# Altium PCB PCB2.PcbDoc (part 2 of 2)
Units mil, origin at the board's own origin, x right, y up, seen from the top; angles counter-clockwise.
Board outline 3543.02 x 3779.37 mil, 2 copper layers (Top Layer, Bottom Layer), stack 62.206 mil thick; 106 components, 60 nets, 312 pads, 222 vias.
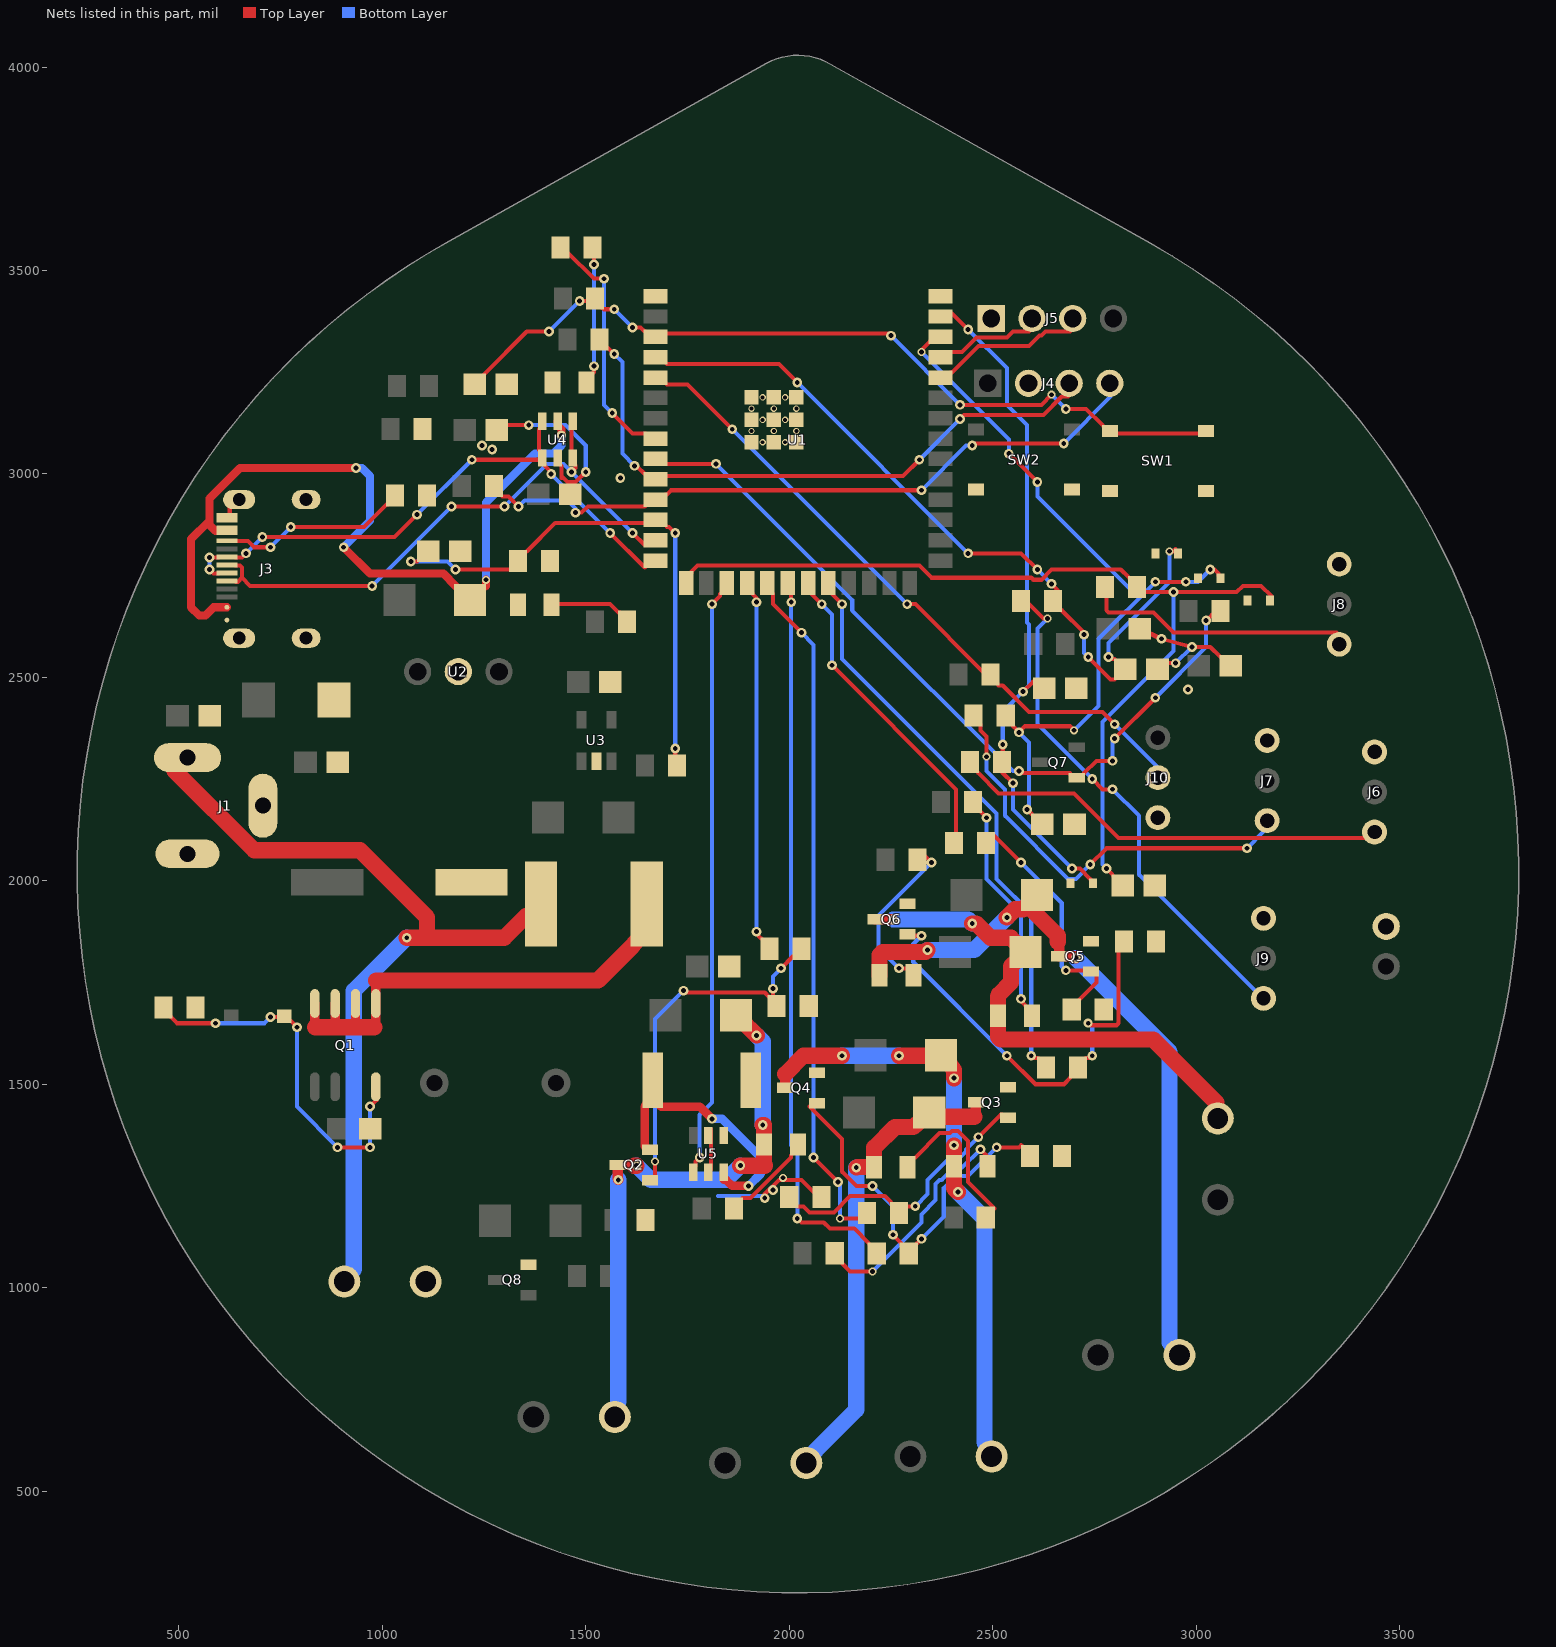
[diagram p2: the nets of this part, all layers, seen from the top]

## Via types
v1: diameter 24.02, hole 12.01, Top Layer to Bottom Layer, tented both sides, 192 vias
v2: diameter 19.68, hole 11.81, Top Layer to Bottom Layer, tented both sides, 15 vias
v3: diameter 15.75, hole 9.8, Top Layer to Bottom Layer, tented both sides, 12 vias
v4: diameter 22, hole 12, Top Layer to Bottom Layer, tented both sides, 3 vias

## Nets (pads, with @x,y where several pads share a name; then routed paths per layer and width w, separated by ;. In a path a pad name is that pad's centre, name@x,y a point inside that pad or via, vN(x,y) a via of type N, cw(c..) or ccw(c..) an arc to the next point about the centre after c; other vN are vias at no path point) (continued)
CC2: J3.B5 R8.1 | length 473.6
  Top Layer w10: J3.B5@617.9,2835.7 638.49,2835 640,2835 670,2835 685,2820 v1(725,2820) ; v1(775,2870) 955,2870 1010,2925 1013.66,2925.48 R8.1@1030.96,2947.59
  Bottom Layer w10: v1(725,2820) v1(775,2870)
DHT_DATA: J10.2 R19.2 U1.5 | length 1655
  Top Layer w10: U1.5@1671.13,3237.05 1695.65,3224.33 1700,3220 1750,3220 v1(1860,3110) ; v1(2290,2680) 2310,2680 2475,2515 2477.27,2515 R19.2@2494.56,2506.7 2511.86,2484.59 2515,2480 2525,2480 2590,2415 2770,2415 v1(2800,2385)
  Bottom Layer w10: v1(1860,3110) v1(2290,2680) ; v1(2800,2385) 2905,2280 2905.04,2279.21 J10.2@2906.33,2253.73
EN: C9.1 R5.2 SW1.1 SW1.2 U1.3 | length 2044.7
  Top Layer w10: C9.1@1226.71,3220.66 1249.46,3242.23 1250,3245 1355,3350 v1(1410,3350) ; v1(1485,3425) 1505,3425 1505.56,3425 R5.2@1522.85,3431.03 1540.15,3408.92 1545,3405 v1(1570,3405) ; v1(1615,3360) 1635,3360 1645,3350 1646.6,3349.76 U1.3@1671.13,3337.05 1695.65,3345 1700,3345 2245,3345 v1(2250,3340) ; v1(2420,3170) 2620,3170 v2(2645,3195) ; v1(2680,3160) 2730,3160 2770,3120 2773.47,3115.53 SW1.1@2788.16,3105.77 2802.84,3100 2805,3100 3005,3100 3009.69,3100 SW1.2@3024.38,3105.77
  Bottom Layer w10: v1(1410,3350) v1(1485,3425) ; v1(1570,3405) v1(1615,3360) ; v1(2250,3340) v1(2420,3170) ; v2(2645,3195) v1(2680,3160)
G_PUMP: Q2.1 R21.2 R22.1 | length 921.3
  Top Layer w10: Q2.1@1657.39,1264.16 1670,1271.96 1670,1275 v2(1670,1310) ; v1(1740,1730) 1745,1725 1940,1725 1950,1715 1952,1714.61 R22.1@1969.29,1692.5 1960,1714.61 1960,1715 v1(1960,1735) ; v1(1980,1785) 2010,1815 2012.99,1815 R21.2@2030.28,1833.09
  Bottom Layer w10: v2(1670,1310) 1670,1660 v1(1740,1730) ; v1(1960,1735) 1960,1765 v1(1980,1785)
G_V1: Q3.1 R24.2 R25.1 | length 715.7
  Top Layer w10: R25.1@2000.32,1223.27 2017.61,1201.17 2020,1200 2035,1200 2050,1185 2110,1185 2150,1225 2235,1225 2250,1210 2252.32,1205.59 R24.2@2269.61,1183.48 2286.91,1200 2290,1200 v1(2310,1200) ; v1(2465,1370) 2520,1425 2523.06,1425 Q3.1@2537.74,1418.14
  Bottom Layer w10: v1(2310,1200) 2340,1230 2340,1265 2390,1315 2415,1315 2435,1335 2435,1340 v1(2465,1370)
G_V2: Q4.1 R27.2 R28.1 | length 967.5
  Top Layer w10: Q4.1@2068.62,1453.52 2053.93,1445.72 2050,1445 2130,1365 2130,1285 2165,1250 v1(2205,1250) ; v1(2255,1130) 2275,1110 2276.74,1105.93 R27.2@2294.03,1083.82 2311.33,1105.93 2315,1110 v1(2325,1120) ; v1(2510,1345) 2565,1345 2570,1350 2574.33,1346.24 R28.1@2591.62,1324.13
  Bottom Layer w10: v1(2205,1250) 2255,1200 v1(2255,1130) ; v1(2325,1120) 2380,1175 2380,1245 2410,1275 2440,1275 v1(2510,1345)
G_V3: Q5.1 R30.2 R31.1 | length 617
  Top Layer w10: R30.2@2484.11,2092.95 2501.4,2110 2505,2110 v1(2570,2045) ; v1(2680,1780) 2725,1780 2727.64,1780 Q5.1@2742.33,1777.08 2755,1769.28 2755,1765 2755,1750 2715,1710 2711.94,1705.8 R31.1@2694.64,1683.69
  Bottom Layer w10: v1(2570,2045) 2670,1945 2670,1790 v1(2680,1780)
G_V4: Q6.1 R33.2 R34.1 | length 1072.7
  Top Layer w10: Q6.1@2290.65,1868.49 2305.34,1865 2310,1865 v1(2325,1865) ; v1(2535,1570) 2605,1500 2675,1500 2690,1515 2692.47,1519.57 R33.2@2709.77,1541.68 2727.06,1563.78 2730,1565 2740,1565 v1(2745,1570) ; v4(2735,1650) 2740,1645 2805,1645 2810,1650 2810,1825 2810,1828.68 R34.1@2822.98,1850.79
  Bottom Layer w10: v1(2325,1865) 2305,1845 2305,1800 v1(2535,1570) ; v4(2735,1650) 2745,1640 v1(2745,1570)
GND: C1.2 C2.2 C3.2 C4.2 C5.2 C6.2 C7.2 C8.2 C9.2 C10.2 C11.2 C12.2 C13.2 C14.2 C15.2 C16.2 D1.2 D6.1 D7.1 D8.1 D9.1 J1.2 J1.3 J2.2 J3.1 J3.2 J3.3 J3.4 J3.A1B12 J3.B1A12 J4.2 J5.1 J6.1 J7.1 J8.1 J9.1 J10.3 J11.2 LED1.2 LED2.2 Q3.2 Q4.2 Q5.2 Q6.2 Q8.2 R1.2 R4.2 R7.2 R8.2 R11.2 R22.2 R25.2 R28.2 R31.2 R34.2 RS1.2 SW1.3 SW1.4 SW2.3 SW2.4 U1.1 U1.40 U1.41 U2.2 U3.2 U4.2 U5.2 U5.4 U5.5 | length 1290
  Top Layer w10: C8.2@1280.94,3108.09 1303.69,3120 1305,3120 v1(1360,3120) ; U4.2@1430.96,3039.26 1436.43,3023.16 1440,3020 1440,2995 1455,2980 1475,2980 v1(1500,3005) ; 1440,2990 1440,3015 ; U5.2@1808,1290 U5.5@1808,1390 ; v1(1940,1220) 1940,1230 1975,1265 ; v1(1960,1240) 1960,1250 1975,1265 ; v2@1980,1265 1975,1265 ; R25.2@2079.06,1223.27 2061.76,1235 2060,1235 2030,1265 1975,1265 ; C14.2@2905.29,2519.62 2928.05,2535 2930,2535 v1(2950,2535) ; v1(2915,2595) v1(2990,2575) 3035,2575 3060,2550 3063.04,2549.88 C15.2@3085.79,2528.3
  Top Layer w12: J3.B1A12@625,2893 J3.1@625,2937 ; C10.2@2861.86,2619.99 v1(2915,2595)
  Bottom Layer w10: v1(1360,3120) 1450,3120 1500,3070 v1(1500,3005) ; 1825,1225 1935,1225 v1(1940,1220) ; v1(2950,2535) v1(2990,2575)
  other v1: 2980,2470 1585,2990 1270,3060 1245,3070
  other v2: 1985,1270
  other v3: 1934.91,3078.01 1990.03,3078.01 1907.35,3105.57 1962.47,3105.57 2017.59,3105.57 1934.91,3133.13 1990.03,3133.13 1907.35,3160.69 1962.47,3160.69 2017.59,3160.69 1934.91,3188.25 1990.03,3188.25
LED2_A: LED2.1 R9.2 | length 338.7
  Top Layer w10: LED2.1@1501.28,3224.85 1515.96,3247.4 1520,3250 v1(1520,3265) ; R9.2@1516.43,3556.74 1520,3534.64 1520,3530 v1(1520,3515)
  Bottom Layer w10: v1(1520,3265) v1(1520,3515)
LED_PUMP: LED3.1 R23.2 | length 231.3
  Top Layer w10: R23.2@1863.96,1194.12 1881.26,1216.22 1885,1220 1905,1220 2005,1320 2005,1325 2006.55,1329.33 LED3.1@2021.24,1351.88
LED_V1: LED4.1 R26.2 | length 423.4
  Top Layer w10: LED4.1@2290.73,1296.26 2305.41,1318.81 2310,1320 2370,1380 2395,1380 2400,1385 2415,1385 2440,1360 2440,1260 2505,1195 2500.54,1194.46 R26.2@2483.25,1172.36
LED_V2: LED5.1 R29.2 | length 586.8
  Top Layer w10: R29.2@2111.89,1084.66 2129.18,1062.56 2130,1060 2150,1040 v2(2205,1040) ; v1(2470,1340) 2485,1325 2485,1320.57 LED5.1@2487.27,1298.02
  Bottom Layer w10: v2(2205,1040) 2325,1160 2325,1180 2360,1215 2360,1255 2370,1265 2375,1265 2405,1295 2425,1295 v1(2470,1340)
LED_V3: LED6.1 R32.2 | length 420.9
  Top Layer w10: v1(2270,1785) 2290,1785 2290.56,1785 LED6.1@2305.25,1767.54 ; R32.2@2315.09,2051.76 2332.38,2060 2335,2060 v1(2350,2045)
  Bottom Layer w10: v1(2270,1785) 2220,1835 2220,1915 v1(2350,2045)
LED_V4: LED7.1 R35.2 | length 581.8
  Top Layer w10: R35.2@2452.08,2193.44 2469.38,2171.34 2470,2170 v1(2485,2155) ; v1(2570,1710) 2570,1705 2580,1695 2581.7,1690.5 LED7.1@2596.39,1667.95
  Bottom Layer w10: v1(2485,2155) 2485,2005 2565,1925 2565,1920 2570,1915 v1(2570,1710)
LED_WIFI: R9.1 U1.8 | length 606.1
  Top Layer w10: R9.1@1437.69,3556.74 1454.99,3545 1520,3480 v1(1545,3480) ; v1(1565,3150) 1615,3100 1645,3100 1646.6,3099.76 U1.8@1671.13,3087.05
  Bottom Layer w10: v1(1545,3480) 1545,3170 v1(1565,3150)
MOIST1: C11.1 D6.2 R15.2 U1.39 | length 1706.5
  Top Layer w10: U1.39@2371.9,3387.05 2396.42,3395 2400,3395 v1(2440,3355) ; v1(2525,2335) 2525,2315 2525,2313.84 R15.2@2523.15,2291.73 2525,2269.63 2525,2265 v1(2550,2240) ; v1(2575,2465) 2600,2490 2604.52,2490 C11.1@2627.28,2473.12 ; v1(2695,2030) 2715,2030 2740,2005 2741.52,2001.23 D6.2@2746.37,1994.42
  Bottom Layer w10: v1(2440,3355) 2535,3260 2535,3170 2585,3120 2585,2635 2590,2630 2590,2480 v1(2575,2465) 2525,2415 v1(2525,2335) ; v1(2550,2240) 2550,2175 v1(2695,2030)
MOIST2: C12.1 D7.2 R16.2 U1.38 | length 1975.5
  Top Layer w10: v2(2325,3300) 2325,3305 2345,3325 2347.37,3325 U1.38@2371.9,3337.05 ; R16.2@2532.23,2406.32 2549.53,2384.21 2550,2380 v1(2565,2365) 2580,2380 2690,2380 v2(2700,2370) ; v1(2540,3050) v1(2610,2980) ; v1(2585,2175) 2595,2165 2599.74,2160.66 C12.1@2622.49,2139.08 ; v1(2900,2735) v1(2975,2735) ; v1(3035,2765) 3045,2765 3055,2755 3055.33,2750.1 D7.2@3060.18,2743.29
  Bottom Layer w10: v2(2325,3300) 2540,3085 v1(2540,3050) ; v1(2565,2365) 2590,2340 2590,2180 v1(2585,2175) ; v1(2610,2980) 2610,2945 2860,2695 ; v2(2700,2370) 2760,2430 2760,2595 v1(2900,2735) ; v1(2975,2735) 3005,2735 v1(3035,2765)
MOIST3: C13.1 D8.2 R17.2 U1.15 | length 2353.2
  Top Layer w10: U1.15@1746.52,2731.96 1759.23,2756.49 1760,2760 1775,2775 2320,2775 2350,2745 2595,2745 2600,2740 2620,2740 2645,2765 2815,2765 2835,2745 2837.47,2744.84 R17.2@2854.76,2722.74 2872.06,2710 2875,2710 3100,2710 3115,2725 3160,2725 3185,2700 3185,2695.9 D8.2@3181.85,2689.09 ; v1(2780,2030) 2795,2015 2796.77,2010.01 C13.1@2819.52,1988.44
  Bottom Layer w10: v1(2780,2030) 2770,2040 2770,2390 2945,2565 v1(2945,2710)
MOIST4: C14.1 D9.2 R18.2 U1.4 | length 1957.1
  Top Layer w10: U1.4@1671.13,3287.05 1695.65,3274.33 1700,3270 1975,3270 v1(2020,3225) ; v1(2440,2805) 2570,2805 v1(2610,2765) ; v1(2645,2730) 2660,2715 2660,2710.15 R18.2@2648.22,2688.04 2665.52,2665.94 2670,2665 2725,2610 v1(2725,2605) ; v1(2735,2550) 2790,2495 2800,2495 2803.8,2498.05 C14.1@2826.55,2519.62 2803.8,2541.2 2800,2545 2790,2545 v1(2785,2550) ; v2(2935,2810) 2945,2810 2950,2815 2950.86,2811.45 D9.2@2955.71,2804.64
  Bottom Layer w10: v1(2020,3225) v1(2440,2805) ; v1(2610,2765) v1(2645,2730) ; v1(2725,2605) 2725,2560 v1(2735,2550) ; v1(2785,2550) 2785,2585 2935,2735 v2(2935,2810)
MSIG1: J6.3 R15.1 | length 1078.1
  Top Layer w10: R15.1@2444.41,2291.73 2461.71,2269.63 2465,2265 2515,2215 2700,2215 2810,2105 3415,2105 3417.22,2106.39 J6.3@3438.83,2119.93
MSIG2: J7.3 R16.1 | length 1053.2
  Top Layer w10: R16.1@2453.49,2406.32 2470,2384.21 2470,2380 2470,2370 2485,2355 v2(2485,2305) ; v1(2740,2040) 2780,2080 v1(3125,2080)
  Bottom Layer w10: v2(2485,2305) 2485,2270 2530,2225 2530,2160 2685,2005 2705,2005 v1(2740,2040) ; v1(3125,2080) 3165,2120 3166.39,2123.99 J7.3@3174.76,2148.08
MSIG3: J8.3 R17.1 | length 675.3
  Top Layer w10: R17.1@2776.02,2722.74 2780,2700.63 2780,2700 2780,2665 2785,2660 2895,2660 2945,2610 3345,2610 3345.94,2606.18 J8.3@3352.06,2581.4
MSIG4: J9.3 R18.1 | length 1271.7
  Top Layer w10: R18.1@2569.48,2688.04 2586.78,2680 2590,2680 2625,2645 v2(2635,2645) ; v1(2745,2250) 2770,2225 v1(2795,2225)
  Bottom Layer w10: v2(2635,2645) 2610,2620 2610,2385 v1(2745,2250) ; v1(2795,2225) 2860,2160 2860,2015 3145,1730 3147.05,1728.13 J9.3@3165.88,1710.91
OUT_PUMP: D10.2 J12.2 LED3.2 Q2.3 | length 1412.2
  Top Layer w25.59: v1(1580,1265) 1578.65,1268.27 Q2.3@1578.65,1301.56 1618.83,1301.56 v1@1620,1300
  Top Layer w39.37: v1(1935,1400) 1938.54,1399.93 LED3.2@1938.54,1351.88 1938.54,1303.83 1940,1300
  Top Layer w40: v1@1620,1300 v1(1625,1300) ; D10.2@1869.78,1669.61 1889.15,1650.24 1905,1635 v1(1920,1620) ; v1(1880,1300) 1940,1300
  Bottom Layer w40: J12.2@1571.36,682.24 1575.68,701.13 1580,720 v1(1580,1265) ; v1(1625,1300) 1660,1265 1845,1265 v1(1880,1300) ; v1(1920,1620) 1935,1605 v1(1935,1400)
OUT_V1: D11.2 J13.2 LED4.2 Q3.3 | length 1188.7
  Top Layer w25.59: 2455,1420 2459,1422.24 Q3.3@2459,1455.54
  Top Layer w39.37: v1(2165,1295) 2167.84,1296.26 LED4.2@2208.03,1296.26 2208.03,1344.31 2210,1345
  Top Layer w40: 2210,1345 2260,1395 2305,1395 2324.97,1411.59 D11.2@2344.34,1430.96 2363.71,1420 2380,1420 2455,1420
  Bottom Layer w40: J13.2@2042.19,569.15 2053.71,584.72 2065,600 2165,700 v1(2165,1295)
OUT_V2: D12.2 J14.2 LED5.2 Q4.3 | length 1469.7
  Top Layer w25.59: Q4.3@1989.88,1490.92 1989.88,1524.21 1990,1525
  Top Layer w39.37: 2405,1245 2404.57,1249.97 LED5.2@2404.57,1298.02 2404.57,1346.07 v1(2405,1350)
  Top Layer w40: 1990,1525 2035,1570 v1(2130,1570) ; v1(2270,1570) 2335,1570 2353.94,1570 D12.2@2373.31,1571.31 2392.68,1551.94 2405,1535 v1(2405,1515) ; 2405,1245 v1(2415,1235)
  Bottom Layer w40: v1(2130,1570) v1(2270,1570) ; v1(2405,1350) v1(2405,1515) ; v1(2415,1235) 2480,1170 2480,620 2488.93,602.34 J14.2@2497.67,585.05
OUT_V3: D13.2 J15.2 LED6.2 Q5.3 | length 1806.8
  Top Layer w25.59: 2660,1850 2663.59,1847.78 Q5.3@2663.59,1814.48 2703.77,1814.48 v1(2705,1810)
  Top Layer w39.37: LED6.2@2222.55,1767.54 2222.55,1818.09 2225,1820
  Top Layer w40: 2225,1820 2230,1825 2335,1825 v1(2340,1830) ; v1(2535,1910) 2555,1930 2575,1930 2590.16,1945.64 D13.2@2609.53,1965.01 2595,1945.64 2595,1930 2660,1865 2660,1850
  Bottom Layer w40: v1(2340,1830) 2455,1830 v1(2535,1910) ; v1(2705,1810) 2935,1580 2935,865 2947.14,849.53 J15.2@2959.1,834.3
OUT_V4: D14.2 J16.2 LED7.2 Q6.3 | length 1280
  Top Layer w25.59: Q6.3@2211.91,1905.89 2252.1,1905.89 v1(2255,1905)
  Top Layer w39.37: 2515,1615 2513.69,1617.4 LED7.2@2513.69,1667.95 2513.69,1716 2515,1720
  Top Layer w40: v1(2450,1895) 2460,1895 2495,1860 2545,1860 2561.19,1844.03 D14.2@2580.56,1824.66 2561.19,1805.29 2545,1790 2545,1750 2515,1720 ; 2515,1615 2520,1610 2895,1610 3050,1455 3051.8,1435.4 J16.2@3053.58,1416.11
  Bottom Layer w40: v1(2255,1905) 2440,1905 v1(2450,1895)
PUMP_EN: R21.1 U1.18 | length 917.9
  Top Layer w10: U1.18@1896.52,2731.96 1909.23,2707.43 1910,2705 1920,2695 v1(1920,2685) ; v1(1920,1875) 1920,1870 1930,1860 1934.25,1855.2 R21.1@1951.54,1833.09
  Bottom Layer w10: v1(1920,1875) v1(1920,2685)
PUMP_ISENSE: U1.17 U5.1 | length 1479.6
  Top Layer w10: U5.1@1763.93,1283.68 1769.4,1299.78 1770,1300 1770,1310 v1(1780,1320) ; v1(1810,2680) 1830,2700 1830,2705 1833.8,2707.43 U1.17@1846.52,2731.96
  Bottom Layer w10: v1(1780,1320) 1780,1425 1810,1455 v1(1810,2680)
PUMP_SRC: Q2.2 RS1.1 U5.3 | length 715.7
  Top Layer w20.95: Q2.2@1657.39,1338.96 1648.17,1341.29 1645,1350 1645,1445 1649.8,1452.14 RS1.1@1664.57,1509.7 1679.34,1452.14 1685,1445 1780,1445 v1(1810,1415) ; U5.3@1838.73,1283.68 1838.73,1265 1845,1265 1860,1250 v1(1900,1250)
  Bottom Layer w20.95: v1(1810,1415) 1835,1415 1930,1320 1930,1280 v1(1900,1250)
PWR_LED_A: LED1.1 R2.2 | length 204.4
  Top Layer w10: LED1.1@1416.25,2678.51 1430.94,2680 1435,2680 1560,2680 1580,2660 1584.14,2658.96 R2.2@1601.43,2636.85
Q1_G: D2.2 Q1.4 R1.1 | length 934.6
  Top Layer w10: R1.1@462.41,1689.04 479.7,1666.93 480,1665 495,1650 v1(590,1650) ; v1(725,1665) 745,1665 745.61,1665 D2.2@758.52,1666.64 771.43,1655.1 775,1655 v1(790,1640) ; v1(890,1345) v1(970,1345) ; v1(970,1445) 985,1460 984.67,1463.4 Q1.4@984.03,1493.8
  Bottom Layer w10: v1(590,1650) 710,1650 v1(725,1665) ; v1(790,1640) 790,1445 v1(890,1345) ; v1(970,1345) v1(970,1445)
RXD0: J5.3 U1.36 | length 395.6
  Top Layer w10: U1.36@2371.9,3237.05 2396.42,3249.76 2400,3250 2465,3315 2590,3315 2615,3340 2620,3340 2630,3350 2690,3350 2690.95,3354.43 J5.3@2696.92,3382.26
SCL: J4.4 R13.2 U1.11 | length 1710.7
  Top Layer w10: R13.2@1274.06,2970.41 1291.35,2948.31 1295,2945 1310,2945 v1(1335,2920) ; v1(1475,2905) 1490,2905 1505,2920 1645,2920 1646.6,2924.33 U1.11@1671.13,2937.05 1695.65,2949.76 1700,2950 1710,2960 v1(2325,2960) ; v1(2450,3070) 2455,3075 v1(2675,3075)
  Bottom Layer w10: v1(1335,2920) 1350,2935 1455,2935 1475,2915 v1(1475,2905) ; v1(2325,2960) 2435,3070 v1(2450,3070) ; v1(2675,3075) 2790,3190 2789.75,3194.51 J4.4@2788.17,3222.93
SDA: J4.3 R12.2 U1.10 | length 1539
  Top Layer w10: R12.2@1533.62,3330.1 1550.91,3310 1555,3310 v1(1570,3295) ; v1(1620,3020) 1625,3020 1645,3000 1646.6,2999.76 U1.10@1671.13,2987.05 1695.65,2995 1700,2995 2280,2995 v1(2320,3035) ; v1(2420,3135) 2430,3145 2625,3145 2670,3190 2685,3190 2685.44,3194.6 J4.3@2688.17,3222.93
  Bottom Layer w10: v1(1570,3295) 1590,3275 1590,3050 v1(1620,3020) ; v1(2320,3035) v1(2420,3135)
SENS_PWR_N: Q7.1 R14.2 U1.9 | length 1960.4
  Top Layer w10: U1.9@1671.13,3037.05 1695.65,3025 1700,3025 v1(1820,3025) ; v1(2565,2270) 2570,2265 2690,2265 2692.16,2260.51 Q7.1@2706.84,2253.69 2721.53,2260.51 2725,2265 2755,2295 v1(2795,2295) ; v1(2800,2350) v1(2900,2450) ; v1(3025,2640) 3040,2655 3043.2,2655 R14.2@3060.5,2663.28
  Bottom Layer w10: v1(1820,3025) 2155,2690 2155,2665 2550,2270 v1(2565,2270) ; v1(2795,2295) 2795,2345 v1(2800,2350) ; v1(2900,2450) 3025,2575 v1(3025,2640)
TXD0: J5.2 U1.37 | length 274.9
  Top Layer w10: U1.37@2371.9,3287.05 2396.42,3299.76 2400,3300 2425,3300 2460,3335 2535,3335 2550,3350 2590,3350 2590.95,3354.43 J5.2@2596.92,3382.26
USB_DN: J3.A7 J3.B7 U1.13 U4.3 U4.4 | length 1471.2
  Top Layer w10: J3.B7@617.9,2737.27 638.49,2736.36 640,2735 645,2735 655,2745 ; J3.A7@617.9,2776.64 638.49,2775.73 640,2775 650,2775 655,2770 655,2745 ; v1(975,2725) 675,2725 655,2745 ; v1(1170,2920) v1(1300,2920) ; v1(1465,3005) 1475,3015 1475,3020 1473.83,3023.16 U4.3@1468.36,3039.26 1465,3055.36 1465,3060 1465,3110 1465,3113.64 U4.4@1468.36,3129.74 ; v1(1615,2855) 1645,2825 1646.6,2825 U1.13@1671.13,2837.05
  Bottom Layer w10: v1(975,2725) v1(1170,2920) ; v1(1300,2920) 1405,3025 1445,3025 v1(1465,3005) v1(1615,2855)
USB_DP: J3.A6 J3.B6 U1.14 U4.1 U4.6 | length 1495.3
  Top Layer w10: v1(575,2765) 585,2755 595,2755 597.31,2756.05 J3.A6@617.9,2756.96 ; v1(575,2795) 595,2795 597.31,2795.42 J3.B6@617.9,2796.33 638.49,2795.42 640,2795 655,2795 v1(665,2805) ; v1(705,2845) 1030,2845 v1(1085,2900) ; v1(1220,3035) 1385,3035 1388.09,3035 U4.1@1393.56,3039.26 ; U4.6@1393.56,3129.74 1388.09,3113.64 1385,3110 1385,3060 1388.09,3055.36 U4.1@1393.56,3039.26 ; v1(1415,3000) 1415,3005 1400,3020 1399.03,3023.16 U4.1@1393.56,3039.26 ; v1(1560,2855) 1645,2770 1646.6,2774.33 U1.14@1671.13,2787.05
  Bottom Layer w10: v1(575,2765) v1(575,2795) ; v1(665,2805) v1(705,2845) ; v1(1085,2900) v1(1220,3035) ; v1(1415,3000) v1(1560,2855)
VALVE1_EN: R24.1 U1.19 | length 1704
  Top Layer w10: U1.19@1946.52,2731.96 1959.23,2707.43 1960,2705 1960,2680 v1(2030,2610) ; v1(2060,1320) v1(2120,1260) ; v2(2125,1170) 2170,1170 2173.58,1170 R24.1@2190.87,1183.48
  Bottom Layer w10: v1(2030,2610) 2060,2580 v1(2060,1320) ; v1(2120,1260) 2125,1255 v2(2125,1170)
VALVE2_EN: R27.1 U1.20 | length 1802.6
  Top Layer w10: U1.20@1996.52,2731.96 2005,2707.43 2005,2705 v1(2005,2685) ; v1(2020,1170) 2030,1160 2085,1160 2100,1145 2160,1145 2195,1110 2198,1105.93 R27.1@2215.29,1083.82
  Bottom Layer w10: v1(2005,2685) 2005,1350 2020,1335 v1(2020,1170)
VALVE3_EN: R30.1 U1.21 | length 788
  Top Layer w10: U1.21@2046.52,2731.96 2055,2707.43 2055,2705 v1(2080,2680) ; v1(2105,2530) 2410,2225 2410,2120 2410,2115.05 R30.1@2405.37,2092.95
  Bottom Layer w10: v1(2080,2680) 2105,2655 v1(2105,2530)
VALVE4_EN: R33.1 U1.22 | length 1415.4
  Top Layer w10: U1.22@2096.52,2731.96 2105,2707.43 2105,2705 v1(2130,2680) ; v1(2595,1570) 2600,1565 2610,1565 2613.73,1563.78 R33.1@2631.03,1541.68
  Bottom Layer w10: v1(2130,2680) 2130,2545 2510,2165 2510,2005 2595,1920 v1(2595,1570)
VBUS: D4.2 J3.A4B9 J3.B4A9 U4.5 | length 2015.1
  Top Layer w20: 575,2885 530,2840 530,2672.31 550,2652.31 565,2652.31 585,2672.31 J3.A4B9@617.9,2672.31 ; J3.B4A9@617.9,2861.29 602.31,2860 595,2860 590,2860 575,2875 575,2940 650,3015 v1(935,3015) ; v1(905,2820) 970,2755 1150,2755 1180,2725 1186.3,2719.14 D4.2@1215.67,2689.77 1245.04,2719.14 1255,2725 v2(1255,2740) ; U4.5@1430.96,3129.74 1431.43,3118.64 1440,3110 v1(1440,3095)
  Bottom Layer w20: v1(905,2820) 970,2885 970,2995 950,3015 v1(935,3015) ; v2(1255,2740) 1255,2930 1375,3050 1420,3050 1440,3070 v1(1440,3095)
VIN_F: F1.2 Q1.5 Q1.6 Q1.7 Q1.8 | length 1326.5
  Top Layer w23.15: Q1.8@834.03,1698.53 834.03,1642.59 835,1640 ; 880,1640 884.03,1642.59 ; 885,1640 884.03,1642.59 ; 930,1640 934.03,1642.59 ; 935,1640 934.03,1642.59 ; 980,1640 984.03,1642.59 Q1.5@984.03,1698.53 984.03,1754.46 985,1755 ; 884.03,1642.59 Q1.7@884.03,1698.53 884.03,1642.59 ; 934.03,1642.59 Q1.6@934.03,1698.53 934.03,1642.59
  Top Layer w40: 835,1640 880,1640 ; 885,1640 930,1640 ; 935,1640 980,1640 ; 985,1755 1530,1755 1615,1840 1630.58,1858.84 F1.2@1649.95,1943.17
VIN_RAW: F1.1 J1.1 J2.1 | length 2146
  Top Layer w40: J1.1@521.23,2302.75 490,2287.32 490,2270 685,2075 945,2075 1110,1910 1110,1860 ; v1(1060,1860) 1300,1860 1355,1915 1370.74,1915 F1.1@1390.11,1943.17
  Bottom Layer w40: J2.1@906.51,1014.9 918.43,1030.17 930,1045 930,1730 v1(1060,1860)
VIN_SENSE: C6.1 R3.2 R4.1 U1.12 | length 1344.8
  Top Layer w10: v1(1070,2785) 1085,2785 1089.94,2788.59 C6.1@1112.7,2810.17 ; v1(1180,2765) 1315,2765 1316.05,2765 R4.1@1333.35,2786.37 1350.64,2808.47 1355,2810 1425,2880 1645,2880 1646.6,2880 U1.12@1671.13,2887.05 1695.65,2874.33 1700,2870 1705,2870 v1(1720,2855) ; v1(1720,2325) 1720,2310 1720,2305.77 R3.2@1724.18,2283.67
  Bottom Layer w10: v1(1070,2785) 1160,2785 v1(1180,2765) ; v1(1720,2325) v1(1720,2855)
pads on no net: J3.A8 J3.B8 U1.16 U1.23 U1.24 U1.25 U1.26 U1.28 U1.29 U1.30 U1.31 U1.32 U1.33 U1.34 U1.35 U3.4

## Polygon pours and split planes (outlines as drawn)
GND on Bottom Layer "Bottom Layer-GND" (solid, remove dead copper, pour order 2): 2868.42,3532.65 2946.35,3486.26 3021.74,3435.85 3094.39,3381.56 3164.1,3323.55 3230.68,3261.96 3293.94,3196.98 3353.72,3128.78 3409.84,3057.54 3462.16,2983.46 3510.53,2906.74 3554.82,2827.6 3594.9,2746.25 3630.68,2662.91 3662.04,2577.81 3688.91,2491.19 3711.2,2403.28 3728.87,2314.33 3741.85,2224.57 3750.12,2134.26 3753.65,2043.63 3752.44,1952.95 3746.48,1862.45 3735.79,1772.39 3720.4,1683.02 3700.36,1594.57 3675.71,1507.29 3646.53,1421.42 3612.9,1337.19 3574.9,1254.85 3532.65,1174.6 3486.26,1096.67 3435.85,1021.28 3381.56,948.63 3323.55,878.92 3261.96,812.34 3196.98,749.08 3128.78,689.3 3057.54,633.18 2983.46,580.86 2906.74,532.49 2827.6,488.2 2746.25,448.12 2662.91,412.34 2577.81,380.98 2491.19,354.11 2403.28,331.82 2314.33,314.15 2224.57,301.17 2134.26,292.9 2043.63,289.37 1952.95,290.58 1862.45,296.54 1772.39,307.23 1683.02,322.62 1594.57,342.66 1507.29,367.31 1421.42,396.49 1337.19,430.12 1254.85,468.12 1174.6,510.37 1096.67,556.76 1021.28,607.17 948.63,661.46 878.92,719.47 812.34,781.06 749.08,846.04 689.3,914.24 633.18,985.48 580.86,1059.56 532.49,1136.28 488.2,1215.42 448.12,1296.77 412.34,1380.11 380.98,1465.21 354.11,1551.83 331.82,1639.74 314.15,1728.69 301.17,1818.45 292.9,1908.76 289.37,1999.39 290.58,2090.07 296.54,2180.57 307.23,2270.63 322.62,2360 342.66,2448.45 367.31,2535.73 396.49,2621.6 430.12,2705.83 468.12,2788.17 510.37,2868.42 556.76,2946.35 607.17,3021.74 661.46,3094.39 719.47,3164.1 781.06,3230.68 846.04,3293.94 914.24,3353.72 985.48,3409.84 1059.56,3462.16 1136.28,3510.53 1963.77,3974.94 1982.53,3983.4 2002.49,3988.47 2023.02,3990.01 2043.5,3987.95 2063.32,3982.37
GND on Top Layer "Top Layer-GND" (solid, remove dead copper, pour order 0): 2868.42,3532.65 2946.35,3486.26 3021.74,3435.85 3094.39,3381.56 3164.1,3323.55 3230.68,3261.96 3293.94,3196.98 3353.72,3128.78 3409.84,3057.54 3462.16,2983.46 3510.53,2906.74 3554.82,2827.6 3594.9,2746.25 3630.68,2662.91 3662.04,2577.81 3688.91,2491.19 3711.2,2403.28 3728.87,2314.33 3741.85,2224.57 3750.12,2134.26 3753.65,2043.63 3752.44,1952.95 3746.48,1862.45 3735.79,1772.39 3720.4,1683.02 3700.36,1594.57 3675.71,1507.29 3646.53,1421.42 3612.9,1337.19 3574.9,1254.85 3532.65,1174.6 3486.26,1096.67 3435.85,1021.28 3381.56,948.63 3323.55,878.92 3261.96,812.34 3196.98,749.08 3128.78,689.3 3057.54,633.18 2983.46,580.86 2906.74,532.49 2827.6,488.2 2746.25,448.12 2662.91,412.34 2577.81,380.98 2491.19,354.11 2403.28,331.82 2314.33,314.15 2224.57,301.17 2134.26,292.9 2043.63,289.37 1952.95,290.58 1862.45,296.54 1772.39,307.23 1683.02,322.62 1594.57,342.66 1507.29,367.31 1421.42,396.49 1337.19,430.12 1254.85,468.12 1174.6,510.37 1096.67,556.76 1021.28,607.17 948.63,661.46 878.92,719.47 812.34,781.06 749.08,846.04 689.3,914.24 633.18,985.48 580.86,1059.56 532.49,1136.28 488.2,1215.42 448.12,1296.77 412.34,1380.11 380.98,1465.21 354.11,1551.83 331.82,1639.74 314.15,1728.69 301.17,1818.45 292.9,1908.76 289.37,1999.39 290.58,2090.07 296.54,2180.57 307.23,2270.63 322.62,2360 342.66,2448.45 367.31,2535.73 396.49,2621.6 430.12,2705.83 468.12,2788.17 510.37,2868.42 556.76,2946.35 607.17,3021.74 661.46,3094.39 719.47,3164.1 781.06,3230.68 846.04,3293.94 914.24,3353.72 985.48,3409.84 1059.56,3462.16 1136.28,3510.53 1963.77,3974.94 1982.53,3983.4 2002.49,3988.47 2023.02,3990.01 2043.5,3987.95 2063.32,3982.37

## Keep-outs
Board Outline Layer:
  region: 1558.92,3461.36 1558.92,4209.39 2480.16,4209.39 2480.16,3461.36 1558.92,3461.36
  lines w10: 250,1998.88 251.87,1937.07 255.89,1875.36 262.07,1813.83 270.39,1752.56 280.84,1691.61 293.42,1631.06 308.1,1570.99 324.86,1511.47 343.7,1452.56 364.57,1394.36 387.47,1336.91 412.36,1280.3 439.21,1224.59 467.98,1169.86 498.65,1116.16 531.17,1063.56 565.51,1012.14 601.63,961.94 639.47,913.03 679,865.47 720.16,819.32 762.91,774.64 807.19,731.47 852.95,689.88 900.14,649.91 948.69,611.61 998.55,575.03 1049.65,540.21 1101.94,507.19 1155.35,476.02 1209.81,446.74 1265.27,419.37 1321.64,393.95 1378.87,370.52 1436.88,349.1 1495.6,329.71 1554.97,312.39 1614.9,297.15 1675.32,284.01 1736.17,272.98 1797.37,264.09 1858.84,257.34 1920.51,252.74 1982.3,250.29 2044.14,250 2105.95,251.87 2167.66,255.89 2229.19,262.07 2290.46,270.39 2351.41,280.84 2411.96,293.42 2472.03,308.1 2531.55,324.86 2590.46,343.7 2648.66,364.57 2706.11,387.47 2762.72,412.36 2818.43,439.21 2873.16,467.98 2926.86,498.65 2979.46,531.17 3030.88,565.51 3081.08,601.63 3129.99,639.47 3177.55,679 3223.7,720.16 3268.38,762.91 3311.55,807.19 3353.14,852.95 3393.11,900.14 3431.41,948.69 3467.99,998.55 3502.81,1049.65 3535.83,1101.94 3567,1155.35 3596.28,1209.81 3623.65,1265.27 3649.07,1321.64 3672.5,1378.87 3693.92,1436.88 3713.31,1495.6 3730.63,1554.97 3745.87,1614.9 3759.01,1675.32 3770.04,1736.17 3778.93,1797.37 3785.68,1858.84 3790.28,1920.51 3792.73,1982.3 3793.02,2044.14 3791.15,2105.95 3787.13,2167.66 3780.95,2229.19 3772.63,2290.46 3762.18,2351.41 3749.6,2411.96 3734.92,2472.03 3718.16,2531.55 3699.32,2590.46 3678.45,2648.66 3655.55,2706.11 3630.66,2762.72 3603.81,2818.43 3575.04,2873.16 3544.37,2926.86 3511.85,2979.46 3477.51,3030.88 3441.39,3081.08 3403.55,3129.99 3364.02,3177.55 3322.86,3223.7 3280.11,3268.38 3235.83,3311.55 3190.07,3353.14 3142.88,3393.11 3094.33,3431.41 3044.47,3467.99 2993.37,3502.81 2941.08,3535.83 2887.67,3567 2098.5,4009.28 2089.88,4013.77 2077.26,4019.19 2064.21,4023.49 2050.83,4026.63 2037.24,4028.6 2023.52,4029.37 2009.79,4028.95 1996.15,4027.33 1982.7,4024.53 1969.54,4020.56 1956.78,4015.47 1944.52,4009.28 1155.35,3567 1116.16,3544.37 1063.56,3511.85 1012.14,3477.51 961.94,3441.39 913.03,3403.55 865.47,3364.02 819.32,3322.86 774.64,3280.11 731.47,3235.83 689.88,3190.07 649.91,3142.88 611.61,3094.33 575.03,3044.47 540.21,2993.37 507.19,2941.08 476.02,2887.67 446.74,2833.21 419.37,2777.75 393.95,2721.38 370.52,2664.15 349.1,2606.14 329.71,2547.42 312.39,2488.05 297.15,2428.12 284.01,2367.7 272.98,2306.85 264.09,2245.65 257.34,2184.18 252.74,2122.51 250.29,2060.72 250,1998.88

## Other copper
Top Layer:
  region net GND: 1887.6,3200 1887.6,3058.3 2037.3,3058.3 2037.3,3200

## Text inside footprints (layer, text, board x,y; h text height)
BZ1: Top Silkscreen Layer "+" at 1102.3,1547.7 h50